# Altium PCB TestCoupon.PcbDoc
Units mil, origin at the board's own origin, x right, y up, seen from the top; angles counter-clockwise.
Board outline 2074.8 x 2755.91 mil, 4 copper layers (Top Layer, GND, POWER, Bottom Layer), stack 61.066 mil thick; 12 components, 8 nets, 40 pads, 548 vias.
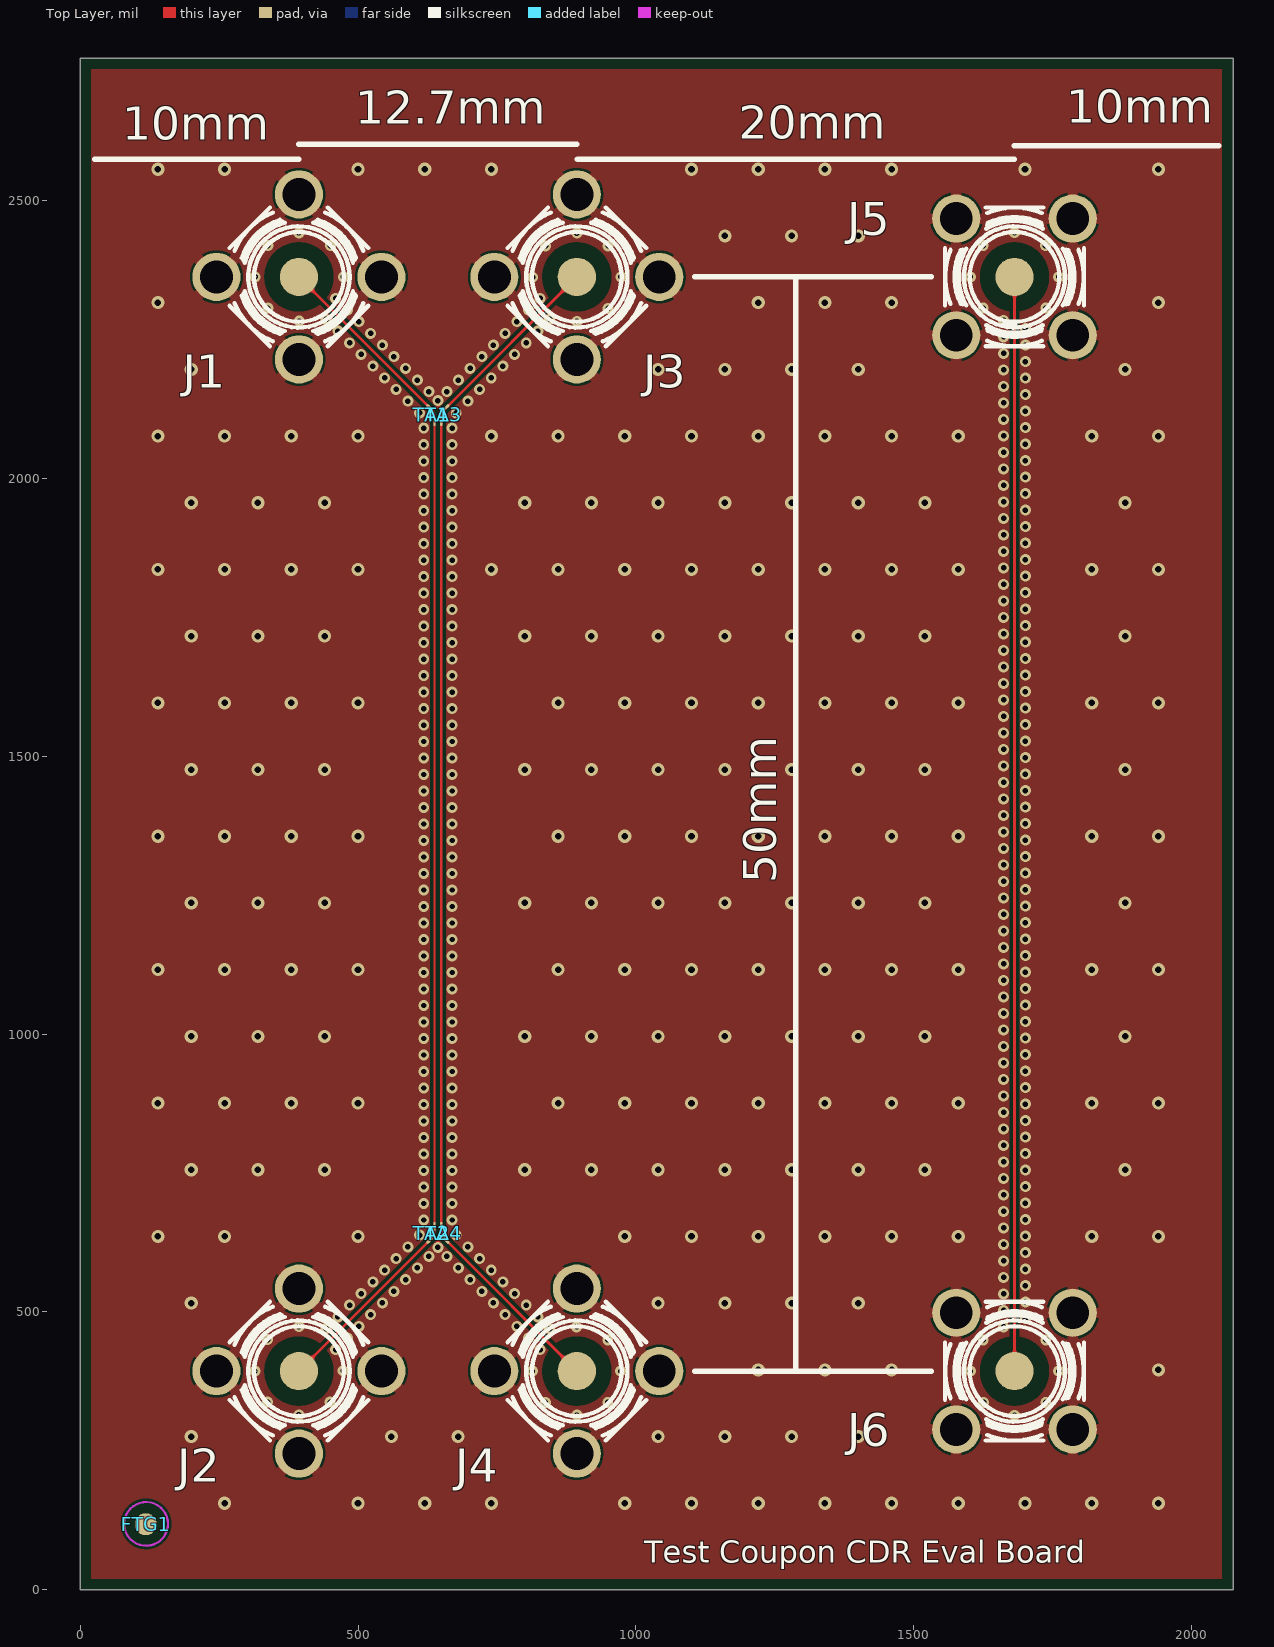
[diagram p0: Top Layer view]
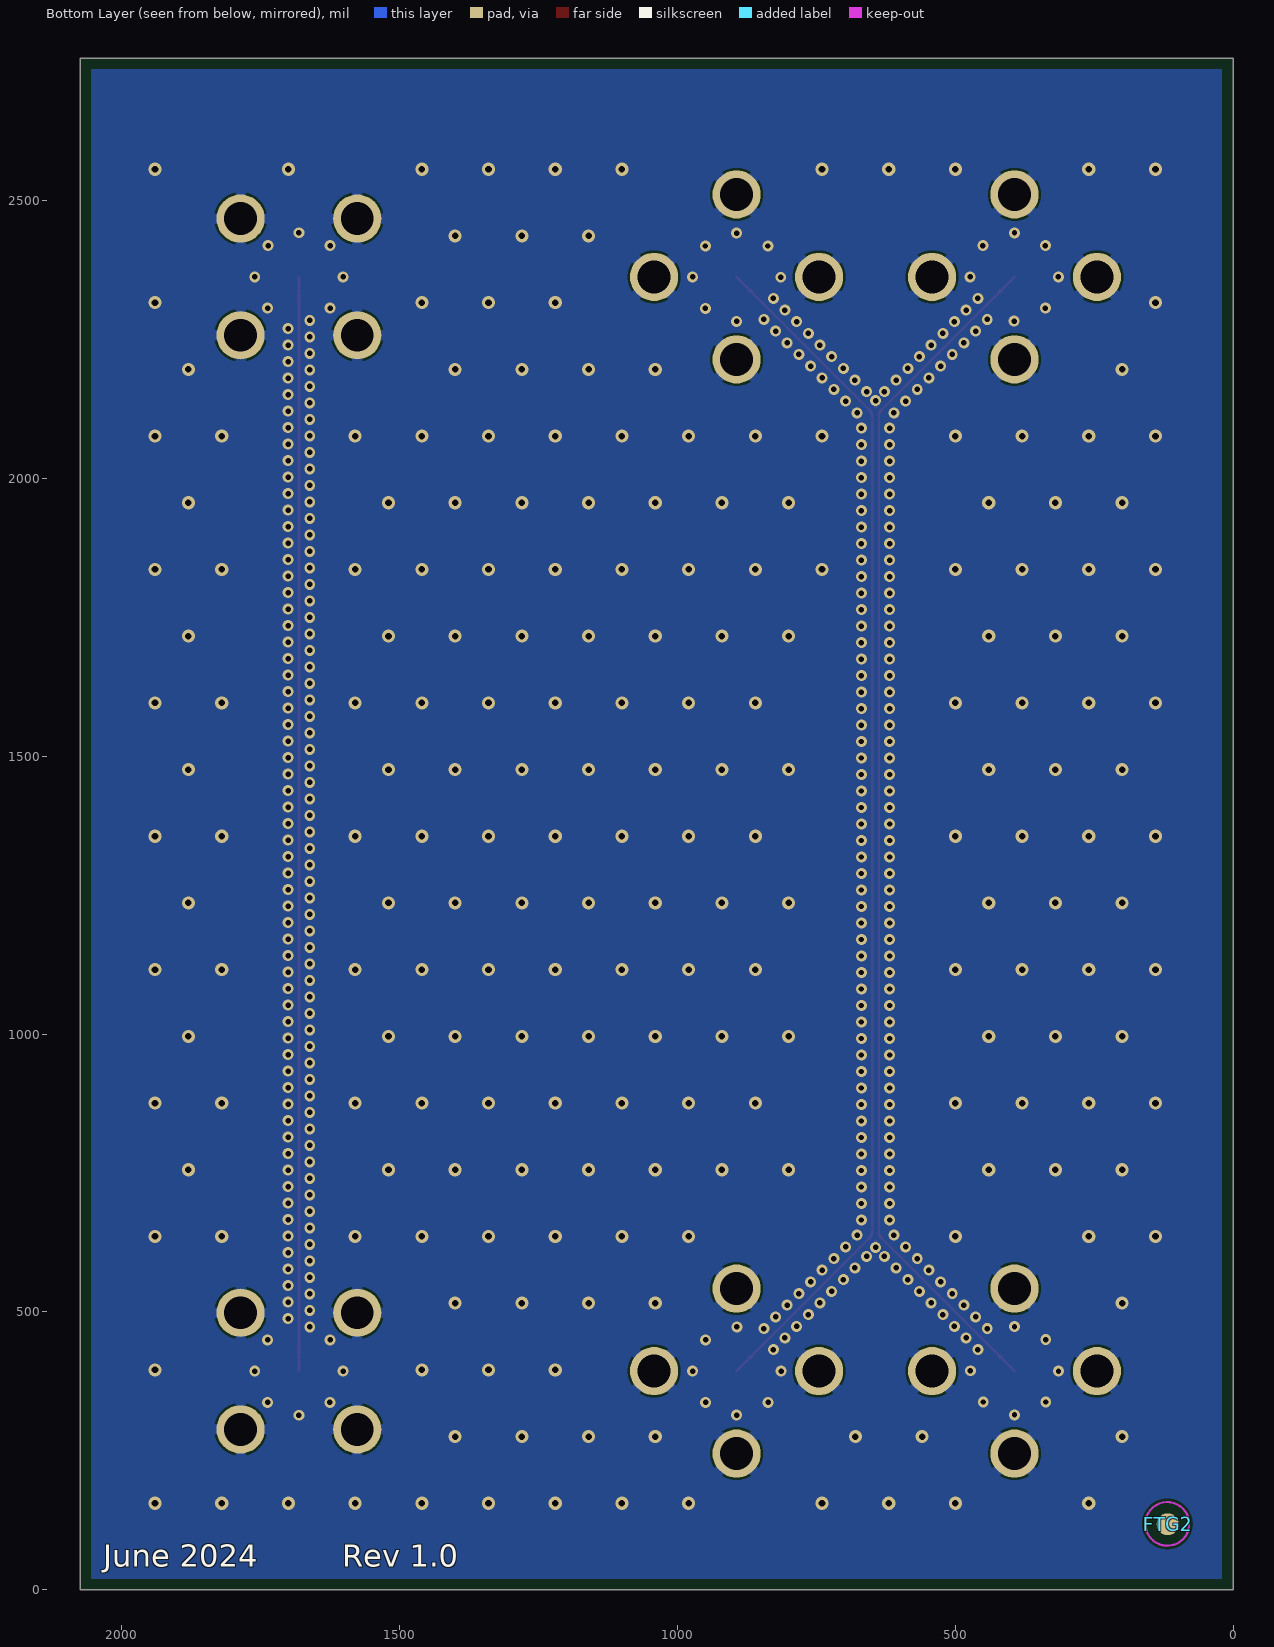
[diagram p1: Bottom Layer view, seen from below]
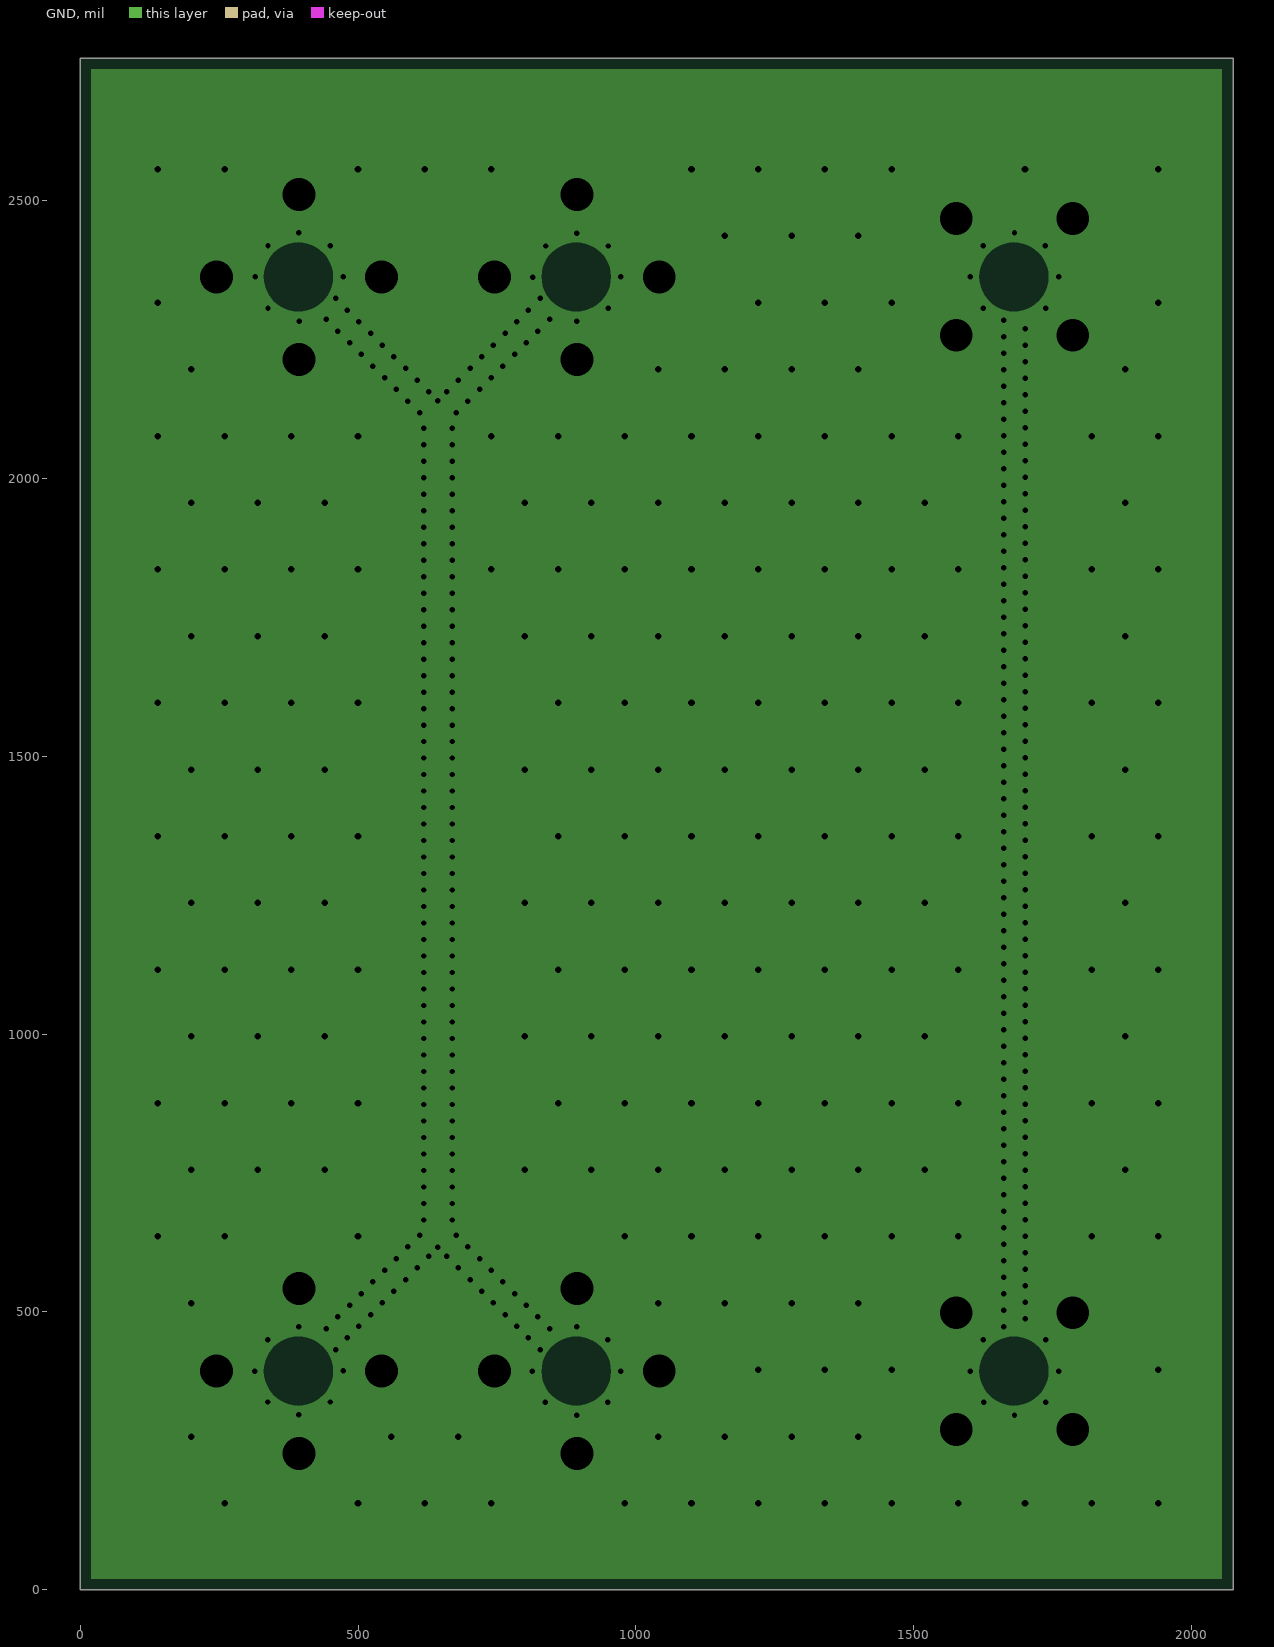
[diagram p2: GND, clearances drawn from the general rule]
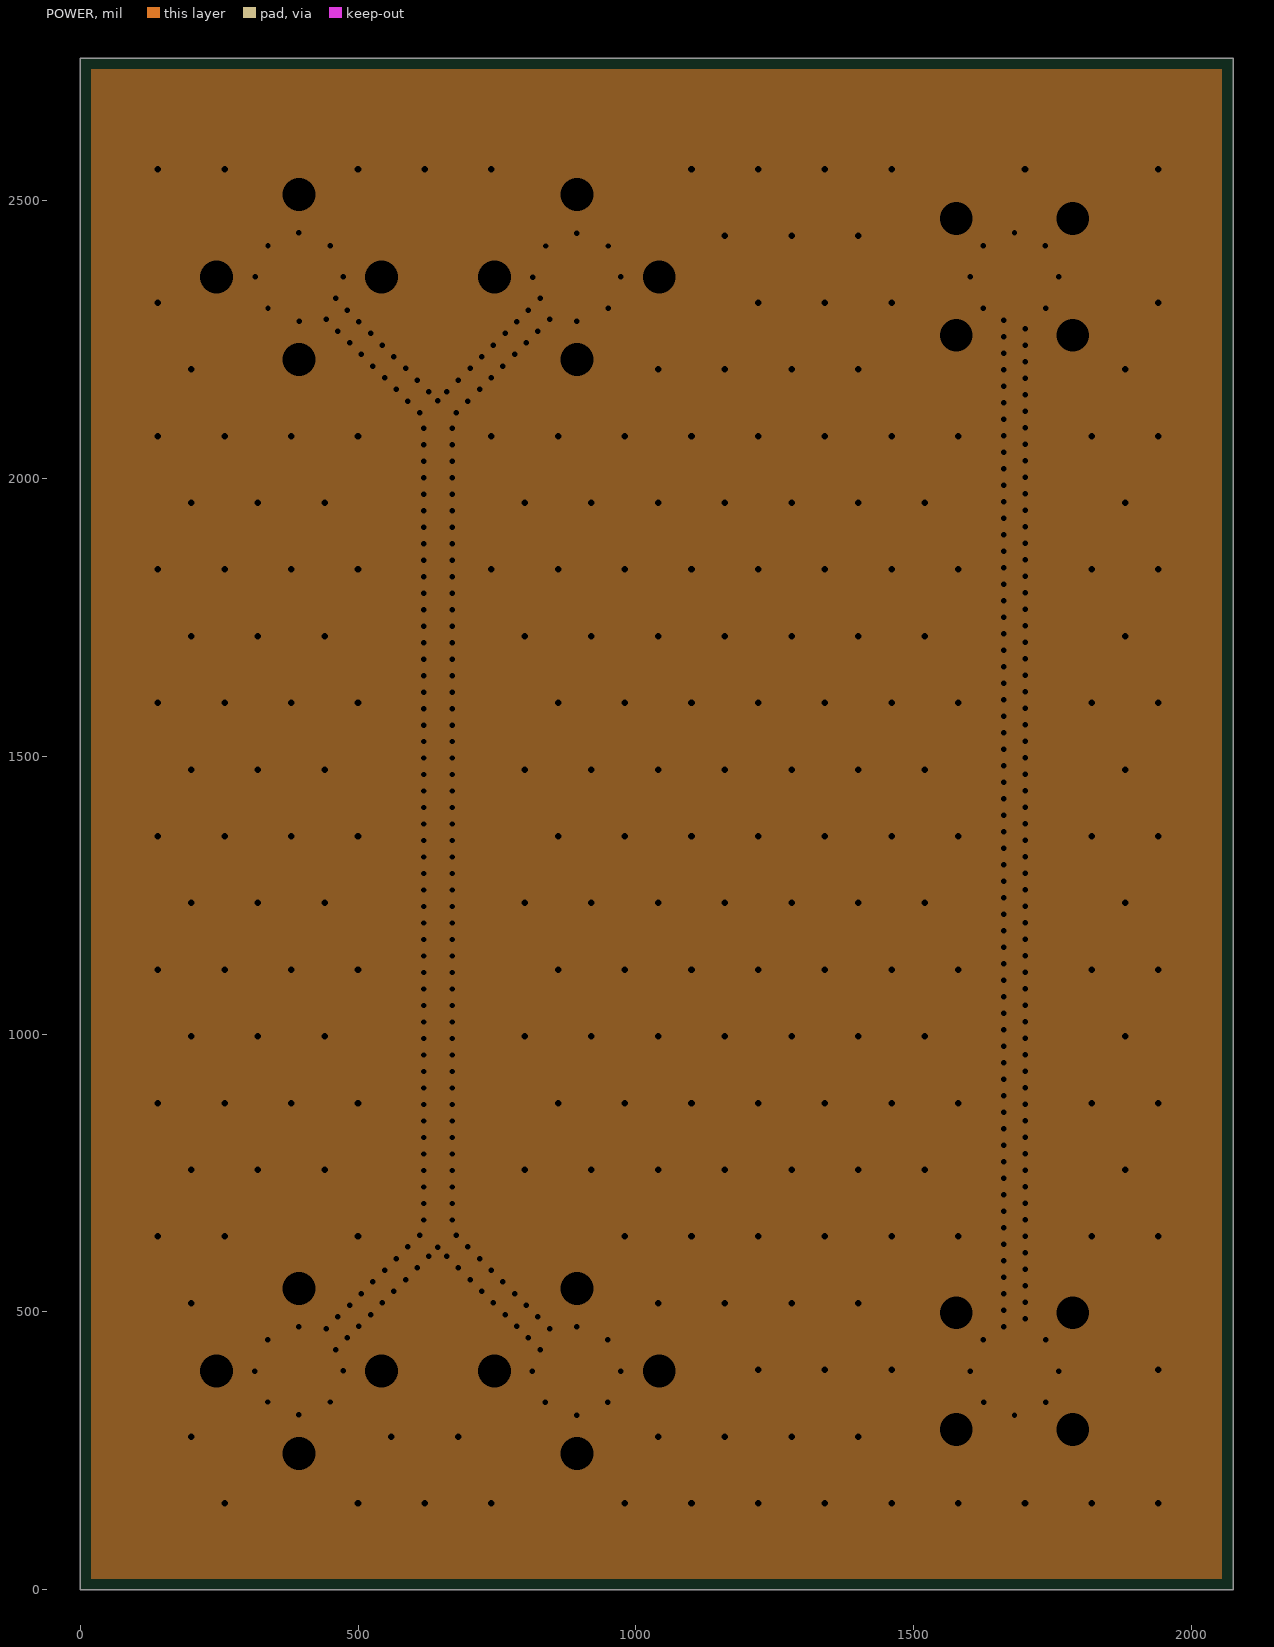
[diagram p3: POWER, clearances drawn from the general rule]
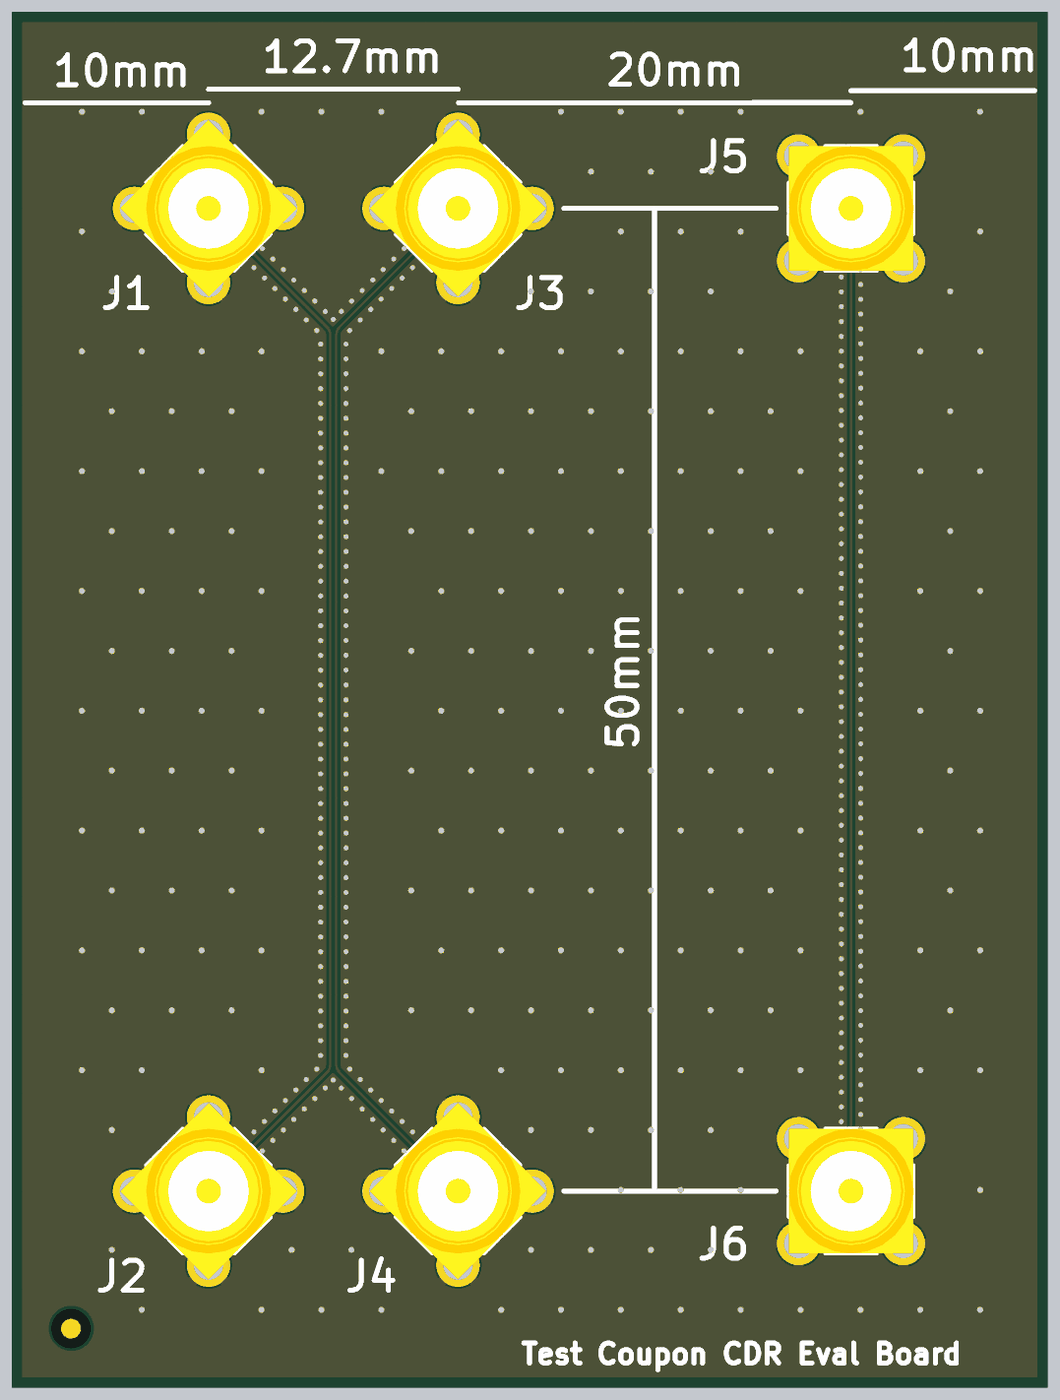
[diagram p4: 3D render of the assembled board from above, using the file's embedded part models]

## Layer stack, top to bottom
Top Solder: solder mask 1.969, Solder Resist, Dk 4.6
Top Layer: signal copper 1.772
Core_Top: core 3.937, R-5775G_1035, Dk 3.46
GND: plane copper 0.689, net GND
PrePreg_Top: prepreg 9.371, R-5670G, Dk 3.4
Core: core 29.528, R-5775G_2116, Dk 3.71
PrePreg_Bot: prepreg 9.371, R-5670G, Dk 3.4
POWER: plane copper 0.689, net GND
Core_Bottom: core 3.937, R-5775G_1035, Dk 3.46
Bottom Layer: signal copper 1.772
Bottom Solder: solder mask 1.969, Solder Resist, Dk 4.6

## Board outline
0,0 0,2755.91 2074.8,2755.91 2074.8,0

## Design rules (kind name [scope] priority, off if disabled: settings)
BoardOutlineClearance BoardOutlineClearance_Silk_PWR_Connector [InComponentClass('PWR_Connector')] p1: gap=0 ignorepadtopadclearanceinfootprint=FALSE
BoardOutlineClearance [All] p2: gap=20 ignorepadtopadclearanceinfootprint=FALSE
Clearance Clearance_SMA_pad [HasFootprint('SAMTEC_SMA-J-P-H-ST-MT1') and InNetClass('50ohm')] p1: gap=4 ignorepadtopadclearanceinfootprint=FALSE except(27.6: SMDPad-Fill SMDPad-Poly SMDPad-Region)
Clearance Clearance_Coplanar [InAnyDifferentialPair or InNetClass('50ohm') or HasFootprint('lane_width_transition')] p2: gap=4 ignorepadtopadclearanceinfootprint=FALSE except(6: Arc-Fill Arc-Poly Arc-Region Track-Fill Track-Poly Track-Region Fill-Fill Fill-Poly Fill-Region Poly-Poly Poly-Region Region-Region)
Clearance [All] p3: gap=4 ignorepadtopadclearanceinfootprint=FALSE
ComponentClearance [All] p1: gap=-20 collisioncheckmode=3 verticalgap=0 showdistances=FALSE
DiffPairsRouting [InDifferentialPairClass('All Differential Pairs')] p1: maxlimit=8.23 minlimit=8.23 mostfreqgap=8.23 toplayer_minwidth=4 toplayer_maxwidth=5.18 toplayer_prefwidth=4 bottomlayer_minwidth=4 bottomlayer_maxwidth=5.18 bottomlayer_prefwidth=4 impedanceprofiledriven=TRUE impedanceprofileid={AE721103-BE0F-4CC0-B565-BE557CF18860} impedanceprofilevalue=100.000000 maxuncoupledlength=200
HoleSize [All] p1: absolutevalues=TRUE maxlimit=255.91 minlimit=9.84 maxpercent=80.000 minpercent=20.000
HoleToHoleClearance [Isvia] p1: gap=11 allowstackedmicrovias=TRUE
HoleToHoleClearance HoleToHoleClearance_Standard [All] p2: gap=16 allowstackedmicrovias=TRUE
MatchedLengths MatchedLengths_Output_Lanes [InNetClass('Output_Lanes')] p1: tolerance=10 checknetsindiffpair=FALSE checkdiffpairvsdiffpair=TRUE checkxsignals=TRUE checkothers=TRUE
MatchedLengths MatchedLengths_Inside [InDifferentialPairClass('All Differential Pairs')] p2: tolerance=1 checknetsindiffpair=TRUE checkdiffpairvsdiffpair=FALSE checkxsignals=FALSE checkothers=FALSE
MinimumAnnularRing [not IsVia] p1: minimumring=6
MinimumSolderMaskSliver [All] p1: minsoldermaskwidth=2
PlaneClearance [All] p1: clearance=6
PlaneConnect PlaneConnect_Frame_Hole [InPadClass('Frame_Holes')] p1: planeconnectstyle=Direct reliefexpansion=20 reliefentries=4 reliefconductorwidth=10 reliefairgap=10
PlaneConnect PlaneConnect_PWR [InComponentClass('PWR_Jumper')] p2: planeconnectstyle=Relief reliefexpansion=20 reliefentries=4 reliefconductorwidth=25 reliefairgap=7
PlaneConnect [All] p3: pad.planeconnectstyle=Relief pad.reliefexpansion=20 pad.reliefentries=4 pad.reliefconductorwidth=12 pad.reliefairgap=7 via.planeconnectstyle=Direct via.reliefexpansion=20 via.reliefentries=4 via.reliefconductorwidth=10 via.reliefairgap=10
PolygonConnect PolygonConnect_Frame_Hole [InPadClass('Frame_Holes')] p1: connectstyle=Direct reliefconductorwidth=10 reliefentries=4 polygonreliefangle="90 Angle" airgapwidth=10
PolygonConnect PolygonConnect_Direct [(HasFootprint('CP_32_11_ADI') OR HasFootprint('LLL03TR61E333KE01') OR HasFootprint('SON50P300X300X80-11N-R175X248') OR HasFootprint('CAPC0510X04N'))] p2: connectstyle=Direct reliefconductorwidth=10 reliefentries=4 polygonreliefangle="90 Angle" airgapwidth=10 // LDO, CDR, some small capacitor
PolygonConnect PolygonConnect_Large [AsMM(PadXSize_AllLayers + PadYSize_AllLayers) > 2.5] p3: thpad.connectstyle=Relief thpad.reliefconductorwidth=20 thpad.reliefentries=4 thpad.polygonreliefangle="90 Angle" thpad.airgapwidth=4 smdpad.connectstyle=Relief smdpad.reliefconductorwidth=25 smdpad.reliefentries=4 smdpad.polygonreliefangle="90 Angle" smdpad.airgapwidth=4 via.connectstyle=Direct via.reliefconductorwidth=10 via.reliefentries=4 via.polygonreliefangle="90 Angle" via.airgapwidth=10
PolygonConnect "PolygonConnect_ Mid" [AsMM(PadXSize_AllLayers + PadYSize_AllLayers) > 1.5] p4: thpad.connectstyle=Relief thpad.reliefconductorwidth=12 thpad.reliefentries=4 thpad.polygonreliefangle="90 Angle" thpad.airgapwidth=4 smdpad.connectstyle=Relief smdpad.reliefconductorwidth=12 smdpad.reliefentries=4 smdpad.polygonreliefangle="90 Angle" smdpad.airgapwidth=4 via.connectstyle=Direct via.reliefconductorwidth=12 via.reliefentries=4 via.polygonreliefangle="90 Angle" via.airgapwidth=5
PolygonConnect [All] p5: thpad.connectstyle=Relief thpad.reliefconductorwidth=10 thpad.reliefentries=4 thpad.polygonreliefangle="90 Angle" thpad.airgapwidth=4 smdpad.connectstyle=Relief smdpad.reliefconductorwidth=8 smdpad.reliefentries=4 smdpad.polygonreliefangle="90 Angle" smdpad.airgapwidth=4 via.connectstyle=Direct via.reliefconductorwidth=10 via.reliefentries=4 via.polygonreliefangle="90 Angle" via.airgapwidth=10
RoutingVias [All] p1: holewidth=9.84 width=19.68 viastyle="Through Hole" minholewidth=9.84 minwidth=19.68 maxholewidth=11.81 maxwidth=23.62
SilkToSilkClearance [All] p1: silktosilkclearance=0
SilkToSolderMaskClearance [IsPad] p1: minsilkscreentomaskgap=3.5 clearancetoexposedcopper=TRUE
SolderMaskExpansion SolderMaskExpansion_Via [IsVia] p1: expansion=4 istentingtop=TRUE
SolderMaskExpansion [All] p2: expansion=0 istentingtop=FALSE
Width Width_lane_width_transition_arcs [HasFootprint('lane_width_transition')] p1: maxlimit=10 minlimit=1 preferedwidth=10 minimp=50.000000 maximp=50.000000 favimp=50.000000
Width Width_50ohm [InNetClass('50ohm')] p2: maxlimit=5.18 minlimit=5.18 preferedwidth=5.18 impedanceprofiledriven=TRUE impedanceprofileid={DDC6E9F5-BC60-4B40-A729-D674AE4FAE2B} impedanceprofilevalue=50.000000 minimp=50.000000 maximp=50.000000 favimp=50.000000
Width [All] p3: maxlimit=100 minlimit=5 preferedwidth=6 minimp=50.000000 maximp=50.000000 favimp=50.000000
21 further rules are at their usual default settings.

## Classes and differential pairs
net class 50ohm: NetJ1_1 NetJ2_1 NetJ3_1 NetJ4_1 SING_1
differential pair DIFF: +DIFF_P -DIFF_N

## Components (designator, comment, footprint, x,y, rotation, side; value= is the part's Value field where it differs from the comment)
FTG1 "Use only in PCB" FIDUCIAL_TOP_C100-200#1 118.75,118.75 r90 top
FTG2 "Use only in PCB" FIDUCIAL_TOP_C100-200#2 118.75,118.75 r90 bottom
J1 "SMA" SAMTEC_SMA-J-P-H-ST-MT1 393.7,2362.21 r45 top locked
J2 "SMA" SAMTEC_SMA-J-P-H-ST-MT1 393.7,393.7 r45 top locked
J3 "SMA" SAMTEC_SMA-J-P-H-ST-MT1 893.7,2362.21 r45 top locked
J4 "SMA" SAMTEC_SMA-J-P-H-ST-MT1 893.7,393.7 r45 top locked
J5 "SMA" SAMTEC_SMA-J-P-H-ST-MT1 1681.1,2362.21 r0 top locked
J6 "SMA" SAMTEC_SMA-J-P-H-ST-MT1 1681.1,393.7 r0 top locked
TA1 "Differential to Single Transition" lane_width_transition#1 643.7,2112.21 r180 top net-tie
TA2 "Differential to Single Transition" lane_width_transition#2 643.7,643.7 r180 top net-tie
TA3 "Differential to Single Transition" lane_width_transition#2 643.7,2112.21 r0 top net-tie
TA4 "Differential to Single Transition" lane_width_transition#1 643.7,643.7 r0 top net-tie

## Footprints (in the part's own frame and the unit in brackets; to place one, negate y for a bottom-side part, rotate by r counter-clockwise, add the part's x,y. Pads: shape width x height; smd on the part's side, far side on the other; paste and mask are expansions set on the pad)
FIDUCIAL_TOP_C100-200#1 [mm] "Round Fiducial Target, Top Layer, 1.0mm, Top Solder 2.0mm, Keepout =2.0mm"
  round 1 smd paste-0.51 mask+0.5: FTG2(-0.016,0.016)
  Top Layer keep-out circle w0.1: c0,0 r1
FIDUCIAL_TOP_C100-200#2 [mm] "Round Fiducial Target, Top Layer, 1.0mm, Top Solder 2.0mm, Keepout =2.0mm"
  round 1 smd paste-0.51 mask+0.5: FTG2(-0.016,-0.016)
  Top Layer keep-out circle w0.1: c0,0 r1
lane_width_transition#1 [mil]
  oval 4x15 smd paste-99999 mask+0: D(6.11,10.45)
  oval 14x5.18 smd rot 135 paste-99999 mask+0: S(15.27,-15.27)
  Top Layer region: 4.61,0.72 5.71,-5.81 8.97,-11.74 13.29,-10.34 10.63,-6.95 9.08,-3.38 7.86,0.45
  Top Layer lines w1: 13.29,-10.34 cw(c27.61,3.63) 7.61,3.63 ; 10.74,-13.69 cw(c24.61,0.72) 4.61,0.72
  Top Layer lines w4: 6.11,5.89 6.11,0.45
  Top Layer lines w5.18: 13.37,-13.37 11.74,-11.74
lane_width_transition#2 [mil]
  oval 4x15 smd paste-99999 mask+0: D(6.11,-10.45)
  oval 14x5.18 smd rot 45 paste-99999 mask+0: S(15.27,15.27)
  Top Layer region: 4.61,-0.72 5.71,5.81 8.97,11.74 13.29,10.34 10.63,6.95 9.08,3.38 7.86,-0.45
  Top Layer lines w1: 13.29,10.34 ccw(c27.61,-3.63) 7.61,-3.63 ; 10.74,13.69 ccw(c24.61,-0.72) 4.61,-0.72
  Top Layer lines w4: 6.11,-0.45 6.11,-5.89
  Top Layer lines w5.18: 13.37,13.37 11.74,11.74
SAMTEC_SMA-J-P-H-ST-MT1 [mm] "50 Ohms SMA Straight Mixed Technology PCB Jack"
  round 1.75 smd: 1(0,0)
  round 2.2 hole 1.5: 2(-2.665,2.665) 2_1(-2.665,-2.665) 2_2(2.665,2.665) 2_3(2.665,-2.665)
  silkscreen extent -3.18,-3.18 3.18,3.18, body extent -3.17,-3.17 3.18,3.18, height 7.95

## Part data
FTG1 FTG2: library part FIDUCIAL_TARGET_C100-200, "Fiducial Target", Author="CERN DEM JLC", Component Type="Standard (No BOM)", ComponentHeight=0mm, CreateDate=09/02/2010, Family=Fiducial, HelpURL=Undefined, LatestRevisionDate=04/04/2012, Mounted=No, PackageDescription="Round Fiducial Target, Top Layer, 1.0mm, Top Solder 2.0mm, Keepout =2.0mm", Part Description="Round Fiducial Target, Top Layer, 1.0mm, Top Solder 2.0mm, Keepout =2.0mm", Part Number=FIDUCIAL_TARGET_C100-200, Pin Count=1, Sense=No, SMD=Yes, Socket=No, Status=None
J1 J2 J3 J4 J5 J6: library part SAMTEC_SMA-J-P-H-ST-MT1, Manufacturer=SAMTEC, Manufacturer Part Number=SMA-J-P-H-ST-MT1, Author="CERN DEM HF", Component Type=Standard, ComponentHeight=7.95mm, CreateDate=5/24/2023, Family=SMA, HelpURL=\\cern.ch\dfs\Applications\Altium\Datasheets\SAMTEC_SMA-J-P-H-ST-MT1.pdf, LatestRevisionDate=5/24/2023, Mounted=Yes, Part Description="50 Ohms SMA Straight Mixed Technology PCB Jack", Part Number=SAMTEC_SMA-J-P-H-ST-MT1, Pin Count=5, PressFit=No, Sense=Yes, Sense Comment="assembly limitations", SMD=Yes, Socket=No, Status="Not Recommended"
TA1 TA2 TA3 TA4: library part lane_width_transition

## Via types
v1: diameter 19.68, hole 9.84, Top Layer to Bottom Layer, tented both sides, 337 vias
v2: diameter 23.62, hole 11.81, Top Layer to Bottom Layer, tented both sides, 211 vias

## Nets (pads, with @x,y where several pads share a name; then routed paths per layer and width w, separated by ;. In a path a pad name is that pad's centre, name@x,y a point inside that pad or via, vN(x,y) a via of type N, cw(c..) or ccw(c..) an arc to the next point about the centre after c; other vN are vias at no path point)
DIFF_N: TA3.D TA4.D | length 1447.6
  Top Layer w4: TA4.D TA3.D
DIFF_P: TA1.D TA2.D | length 1447.6
  Top Layer w4: TA2.D TA1.D
GND: J1.2 J1.2_1 J1.2_2 J1.2_3 J2.2 J2.2_1 J2.2_2 J2.2_3 J3.2 J3.2_1 J3.2_2 J3.2_3 J4.2 J4.2_1 J4.2_2 J4.2_3 J5.2 J5.2_1 J5.2_2 J5.2_3 J6.2 J6.2_1 J6.2_2 J6.2_3 | length 10.3
  Top Layer w5: v1@643.7,622.89 643.7,628.02 ; 643.7,2127.89 v1@643.7,2133.02
  other v1: 1681.1,314.23 393.7,314.78 893.7,314.52 1625.5,337.32 337.5,338.06 449.9,338.06 836.95,337.5 949.35,337.5 1737.3,337.5 314.52,393.7 473.17,394.25 813.68,393.7 972.62,393.7 1601.63,393.7 1760.58,393.7 459.75,432.26 827.66,432.26 949.35,449.9 1624.91,449.9 1737.3,449.9 337.5,450.45 480.74,453.25 806.67,453.25 442.76,470.24 844.64,470.24 893.15,473.17 1661.67,473.27 393.7,473.73 501.73,474.25 785.68,474.25 1700.54,488.11 463.75,491.23 823.65,491.23 522.72,495.24 764.68,495.24 1661.67,502.95 484.74,512.22 802.66,512.22 543.71,516.23 743.69,516.23 1700.54,517.8 505.73,533.21 781.67,533.21 1661.67,532.64 564.7,537.22 722.7,537.22 1700.54,547.48 526.72,554.2 760.68,554.2 585.69,558.21 701.71,558.21 1661.67,562.32 547.71,575.19 739.69,575.19 1700.54,577.17 606.68,579.2 680.72,579.2 1661.67,592.01 568.7,596.18 718.7,596.18 627.67,600.19 659.73,600.19 1700.54,606.85 643.7,616.11 589.69,617.18 697.71,617.18 1661.67,621.7 1700.54,636.54 610.68,638.17 676.72,638.17 1661.67,651.38 618.25,665.49 669.15,665.49 1700.54,666.22 1661.67,681.07 618.25,695.17 669.15,695.17 1700.54,695.91 1661.67,710.75 618.25,724.86 669.15,724.86 1700.54,725.59 1661.67,740.44 618.25,754.54 669.15,754.54 1700.54,755.28 1661.67,770.12 618.25,784.23 669.15,784.23 1700.54,784.96 1661.67,799.81 618.25,813.91 669.15,813.91 1700.54,814.65 1661.67,829.49 618.25,843.6 669.15,843.6 1700.54,844.33 1661.67,859.18 618.25,873.28 669.15,873.28 1700.54,874.02 1661.67,888.86 618.25,902.97 669.15,902.97 1700.54,903.7 1661.67,918.55 618.25,932.65 669.15,932.65 1700.54,933.39 1661.67,948.23 618.25,962.34 669.15,962.34 1700.54,963.07 1661.67,977.92 618.25,992.02 669.15,992.02 1700.54,992.76 1661.67,1007.6 618.25,1021.71 669.15,1021.71 1700.54,1022.44 1661.67,1037.29 618.25,1051.39 669.15,1051.39 1700.54,1052.13 1661.67,1066.97 618.25,1081.08 669.15,1081.08 1700.54,1081.81 1661.67,1096.66 618.25,1110.76 669.15,1110.76 1700.54,1111.5 1661.67,1126.34 618.25,1140.45 669.15,1140.45 1700.54,1141.18 1661.67,1156.03 618.25,1170.13 669.15,1170.13 1700.54,1170.87 1661.67,1185.71 618.25,1199.82 669.15,1199.82 1700.54,1200.55 1661.67,1215.4 618.25,1229.5 669.15,1229.5 1700.54,1230.24 1661.67,1245.08 618.25,1259.19 669.15,1259.19 1700.54,1259.92 1661.67,1274.77 618.25,1288.87 669.15,1288.87 1700.54,1289.61 1661.67,1304.45 618.25,1318.56 669.15,1318.56 1700.54,1319.29 1661.67,1334.14 618.25,1348.24 669.15,1348.24 1700.54,1348.98 1661.67,1363.82 618.25,1377.93 669.15,1377.93 1700.54,1378.66 1661.67,1393.51 618.25,1407.61 669.15,1407.61 1700.54,1408.35 1661.67,1423.19 618.25,1437.3 669.15,1437.3 1700.54,1438.03 1661.67,1452.88 618.25,1466.98 669.15,1466.98 1700.54,1467.72 1661.67,1482.56 618.25,1496.67 669.15,1496.67 1700.54,1497.4 1661.67,1512.25 618.25,1526.35 669.15,1526.35 1700.54,1527.09 1661.67,1541.93 618.25,1556.04 669.15,1556.04 1700.54,1556.77 1661.67,1571.62 618.25,1585.72 669.15,1585.72 1700.54,1586.46 1661.67,1601.3 618.25,1615.41 669.15,1615.41 1700.54,1616.14 1661.67,1630.99 618.25,1645.09 669.15,1645.09 1700.54,1645.83 1661.67,1660.67 618.25,1674.78 669.15,1674.78 1700.54,1675.51 1661.67,1690.36 618.25,1704.46 669.15,1704.46 1700.54,1705.2 1661.67,1720.04 618.25,1734.15 669.15,1734.15 1700.54,1734.88 1661.67,1749.73 618.25,1763.83 669.15,1763.83 1700.54,1764.57 1661.67,1779.41 618.25,1793.52 669.15,1793.52 1700.54,1794.25 1661.67,1809.1 618.25,1823.2 669.15,1823.2 1700.54,1823.94 1661.67,1838.78 618.25,1852.89 669.15,1852.89 1700.54,1853.62 1661.67,1868.47 618.25,1882.57 669.15,1882.57 1700.54,1883.31 1661.67,1898.15 618.25,1912.26 669.15,1912.26 1700.54,1912.99 1661.67,1927.84 618.25,1941.94 669.15,1941.94 1700.54,1942.68 1661.67,1957.52 618.25,1971.63 669.15,1971.63 1700.54,1972.36 1661.67,1987.21 618.25,2001.31 669.15,2001.31 1700.54,2002.05 1661.67,2016.89 618.25,2031 669.15,2031 1700.54,2031.73 1661.67,2046.58 618.25,2060.68 669.15,2060.68 1700.54,2061.42 1661.67,2076.26 618.25,2090.37 669.15,2090.37 1700.54,2091.1 1661.67,2105.95 610.68,2117.74 676.72,2117.74 1700.54,2120.79 1661.67,2135.63 589.69,2138.73 697.71,2138.73 643.7,2139.8 1700.54,2150.48 627.67,2155.72 659.73,2155.72 568.7,2159.72 718.7,2159.72 1661.67,2165.32 606.68,2176.71 680.72,2176.71 1700.54,2180.16 547.71,2180.71 739.69,2180.71 1661.67,2195 585.69,2197.7 701.71,2197.7 526.72,2201.7 760.68,2201.7 1700.54,2209.85 564.7,2218.69 722.7,2218.69 505.73,2222.69 781.67,2222.69 1661.67,2224.69 543.71,2239.68 743.69,2239.68 1700.54,2239.53 484.74,2243.68 802.66,2243.68 1661.67,2254.37 522.72,2260.67 764.68,2260.67 463.75,2264.67 823.65,2264.67 1700.54,2269.22 501.73,2281.66 785.68,2281.66 893.7,2282.18 394.25,2282.73 1661.67,2284.06 442.76,2285.66 844.64,2285.66 480.74,2302.65 806.67,2302.65 338.06,2306.01 949.9,2305.46 1624.91,2306.01 1737.3,2306.01 459.75,2323.64 827.66,2323.64 314.78,2362.21 473.73,2362.21 814.23,2361.65 972.89,2362.21 1601.63,2362.21 1760.58,2362.21 338.06,2418.4 450.45,2418.4 837.5,2417.85 949.9,2417.85 1624.91,2418.4 1736.71,2418.59 393.7,2441.39 893.7,2441.13 1681.1,2441.68
  other v2: 260,155.91 500,155.91 620,155.91 740,155.91 980,155.91 1100,155.91 1220,155.91 1340,155.91 1460,155.91 1580,155.91 1700,155.91 1820,155.91 1940,155.91 200,275.91 560,275.91 680,275.91 1040,275.91 1160,275.91 1280,275.91 1400,275.91 1220,395.91 1340,395.91 1460,395.91 1940,395.91 200,515.91 1040,515.91 1160,515.91 1280,515.91 1400,515.91 140,635.91 260,635.91 500,635.91 980,635.91 1100,635.91 1220,635.91 1340,635.91 1460,635.91 1580,635.91 1820,635.91 1940,635.91 200,755.91 320,755.91 440,755.91 800,755.91 920,755.91 1040,755.91 1160,755.91 1280,755.91 1400,755.91 1520,755.91 1880,755.91 140,875.91 260,875.91 380,875.91 500,875.91 860,875.91 980,875.91 1100,875.91 1220,875.91 1340,875.91 1460,875.91 1580,875.91 1820,875.91 1940,875.91 200,995.91 320,995.91 440,995.91 800,995.91 920,995.91 1040,995.91 1160,995.91 1280,995.91 1400,995.91 1520,995.91 1880,995.91 140,1115.91 260,1115.91 380,1115.91 500,1115.91 860,1115.91 980,1115.91 1100,1115.91 1220,1115.91 1340,1115.91 1460,1115.91 1580,1115.91 1820,1115.91 1940,1115.91 200,1235.91 320,1235.91 440,1235.91 800,1235.91 920,1235.91 1040,1235.91 1160,1235.91 1280,1235.91 1400,1235.91 1520,1235.91 1880,1235.91 140,1355.91 260,1355.91 380,1355.91 500,1355.91 860,1355.91 980,1355.91 1100,1355.91 1220,1355.91 1340,1355.91 1460,1355.91 1580,1355.91 1820,1355.91 1940,1355.91 200,1475.91 320,1475.91 440,1475.91 800,1475.91 920,1475.91 1040,1475.91 1160,1475.91 1280,1475.91 1400,1475.91 1520,1475.91 1880,1475.91 140,1595.91 260,1595.91 380,1595.91 500,1595.91 860,1595.91 980,1595.91 1100,1595.91 1220,1595.91 1340,1595.91 1460,1595.91 1580,1595.91 1820,1595.91 1940,1595.91 200,1715.91 320,1715.91 440,1715.91 800,1715.91 920,1715.91 1040,1715.91 1160,1715.91 1280,1715.91 1400,1715.91 1520,1715.91 1880,1715.91 140,1835.91 260,1835.91 380,1835.91 500,1835.91 740,1835.91 860,1835.91 980,1835.91 1100,1835.91 1220,1835.91 1340,1835.91 1460,1835.91 1580,1835.91 1820,1835.91 1940,1835.91 200,1955.91 320,1955.91 440,1955.91 800,1955.91 920,1955.91 1040,1955.91 1160,1955.91 1280,1955.91 1400,1955.91 1520,1955.91 1880,1955.91 140,2075.91 260,2075.91 380,2075.91 500,2075.91 740,2075.91 860,2075.91 980,2075.91 1100,2075.91 1220,2075.91 1340,2075.91 1460,2075.91 1580,2075.91 1820,2075.91 1940,2075.91 200,2195.91 1040,2195.91 1160,2195.91 1280,2195.91 1400,2195.91 1880,2195.91 140,2315.91 1220,2315.91 1340,2315.91 1460,2315.91 1940,2315.91 1160,2435.91 1280,2435.91 1400,2435.91 140,2555.91 260,2555.91 500,2555.91 620,2555.91 740,2555.91 1100,2555.91 1220,2555.91 1340,2555.91 1460,2555.91 1700,2555.91 1940,2555.91
NetJ1_1: J1.1 TA1.S | length 332
  Top Layer w5.18: J1.1 TA1.S
NetJ2_1: J2.1 TA2.S | length 332
  Top Layer w5.18: J2.1 TA2.S
NetJ3_1: J3.1 TA3.S | length 332
  Top Layer w5.18: TA3.S J3.1
NetJ4_1: J4.1 TA4.S | length 332
  Top Layer w5.18: TA4.S J4.1
SING_1: J5.1 J6.1 | length 1968.5
  Top Layer w5.18: J6.1 J5.1
pads on no net: FTG1.FTG2 FTG2.FTG2

## Polygon pours and split planes (outlines as drawn)
GND on Bottom Layer "GND_L04_P000" (solid, remove dead copper, pour order 0): 0,2755.91 2074.8,2755.91 2074.8,0 0,0
GND on Top Layer "GND_L01_P001" (solid, remove dead copper, pour order 1): 0,2755.91 2074.8,2755.91 2074.8,0 0,0
GND on POWER (split plane): 2054.71,20.1 20.1,20.1 20.1,2735.81 2054.71,2735.81
GND on GND (split plane): 2054.71,20.1 20.1,20.1 20.1,2735.81 2054.71,2735.81

## Other copper
Top Layer:
  pour cut-out: 661.56,2117.91 658.73,2120.74 672.33,2134.34 675.16,2131.52
  pour cut-out: 657.82,2094.29 653.82,2094.29 653.82,2108.89 657.82,2108.89
  pour cut-out: 629.58,2094.29 633.58,2094.29 633.58,2108.89 629.58,2108.89
  pour cut-out: 625.85,2117.91 628.67,2120.74 615.07,2134.34 612.24,2131.52
  pour cut-out: 656.39,2137.04 659.22,2134.21 645.61,2120.61 642.78,2123.44
  pour cut-out: 631.01,2137.04 628.19,2134.21 641.79,2120.61 644.62,2123.44
  region net GND: 640.17,2127.88 647.23,2127.88 645.52,2126.17 641.89,2126.17
  pour cut-out: 629.58,661.62 633.58,661.62 633.58,647.01 629.58,647.01
  pour cut-out: 657.82,661.62 653.82,661.62 653.82,647.01 657.82,647.01
  pour cut-out: 661.56,638 658.73,635.17 672.33,621.56 675.16,624.39
  pour cut-out: 625.85,638 628.67,635.17 615.07,621.56 612.24,624.39
  pour cut-out: 631.01,618.86 628.19,621.69 641.79,635.3 644.62,632.47
  pour cut-out: 656.39,618.86 659.22,621.69 645.61,635.3 642.78,632.47
  region net GND: 647.23,628.02 640.17,628.02 641.89,629.74 645.52,629.74
GND (plane layer: these items are gaps in the copper):
  region: 436.57,2318.33 cw(c392.7,2362.21) 348.83,2318.33 cw(c392.7,2362.21) 348.83,2406.08 cw(c392.7,2362.21) 436.57,2406.08 cw(c392.7,2362.21)
  region: 936.57,2318.33 cw(c892.7,2362.21) 848.83,2318.33 cw(c892.7,2362.21) 848.83,2406.08 cw(c892.7,2362.21) 936.57,2406.08 cw(c892.7,2362.21)
  region: 436.57,349.83 cw(c392.7,393.7) 348.83,349.83 cw(c392.7,393.7) 348.83,437.57 cw(c392.7,393.7) 436.57,437.57 cw(c392.7,393.7)
  region: 936.57,349.83 cw(c892.7,393.7) 848.83,349.83 cw(c892.7,393.7) 848.83,437.57 cw(c892.7,393.7) 936.57,437.57 cw(c892.7,393.7)
  region: 1680.1,331.66 cw(c1680.1,393.7) 1618.06,393.7 cw(c1680.1,393.7) 1680.1,455.75 cw(c1680.1,393.7) 1742.15,393.7 cw(c1680.1,393.7)
  region: 1680.1,2300.16 cw(c1680.1,2362.21) 1618.06,2362.21 cw(c1680.1,2362.21) 1680.1,2424.25 cw(c1680.1,2362.21) 1742.15,2362.21 cw(c1680.1,2362.21)

## Silkscreen, mask and mechanical layers (free items; w line width, h text height)
Top Overlay:
  lines w10: 26.3,2573.72 393.7,2573.72 ; 393.7,2600.83 893.7,2600.83 ; 894.92,2573.72 1681.04,2574.09 ; 1105.99,393.7 1286.56,393.7 ; 1105.99,2362.21 1286.56,2362.21 ; 1287.4,393.7 1287.4,2362.21 ; 1288.25,393.7 1530.94,393.7 ; 1288.25,2362.21 1530.94,2362.21 ; 1661.67,2276.06 1681.1,2276.06 ; 1681.04,2597.9 2048.93,2597.9
  text "10mm" at 1773.98,2639.37 h60
  text "12.7mm" at 494.88,2637.57 h60
  text "20mm" at 1185.09,2610.83 h60
  text "10mm" at 76.05,2609.43 h60
  text "50mm" at 1252.74,1271.44 h60 r90
  text "Test Coupon CDR Eval Board" at 1015.12,48.82 h40
Bottom Overlay:
  text "Rev 1.0" at 1603.57,41.62 h40
  text "June 2024" at 2033.57,41.62 h40